# Altium PCB Alarm-Clock-v1.1.PcbDoc (part 1 of 4)
Units mm, origin at the board's own origin, x right, y up, seen from the top; angles counter-clockwise.
Board outline 56 x 73 mm, 2 copper layers (Top Layer, Bottom Layer), stack 1.448 mm thick; 146 components, 110 nets, 466 pads, 352 vias.
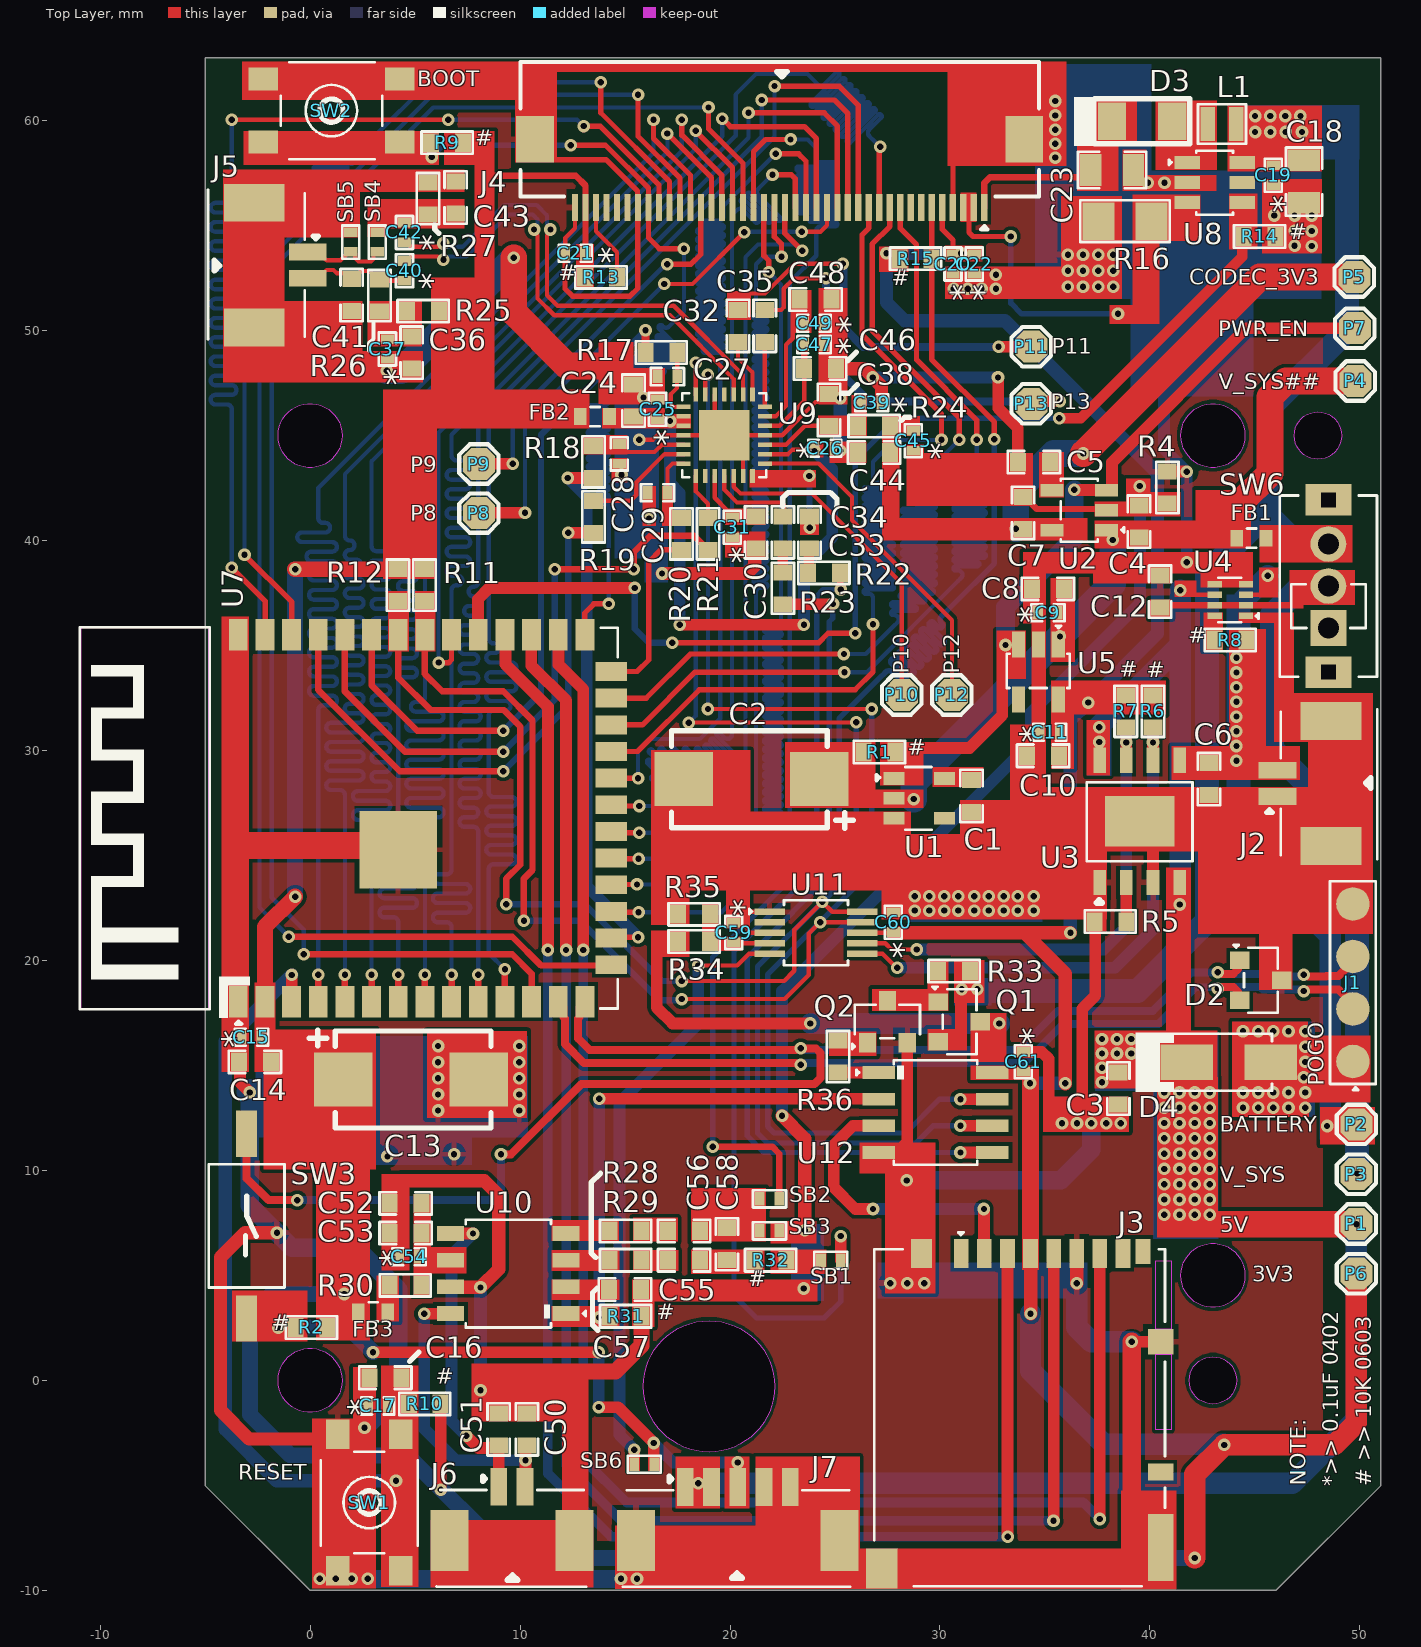
[diagram p0: Top Layer view]
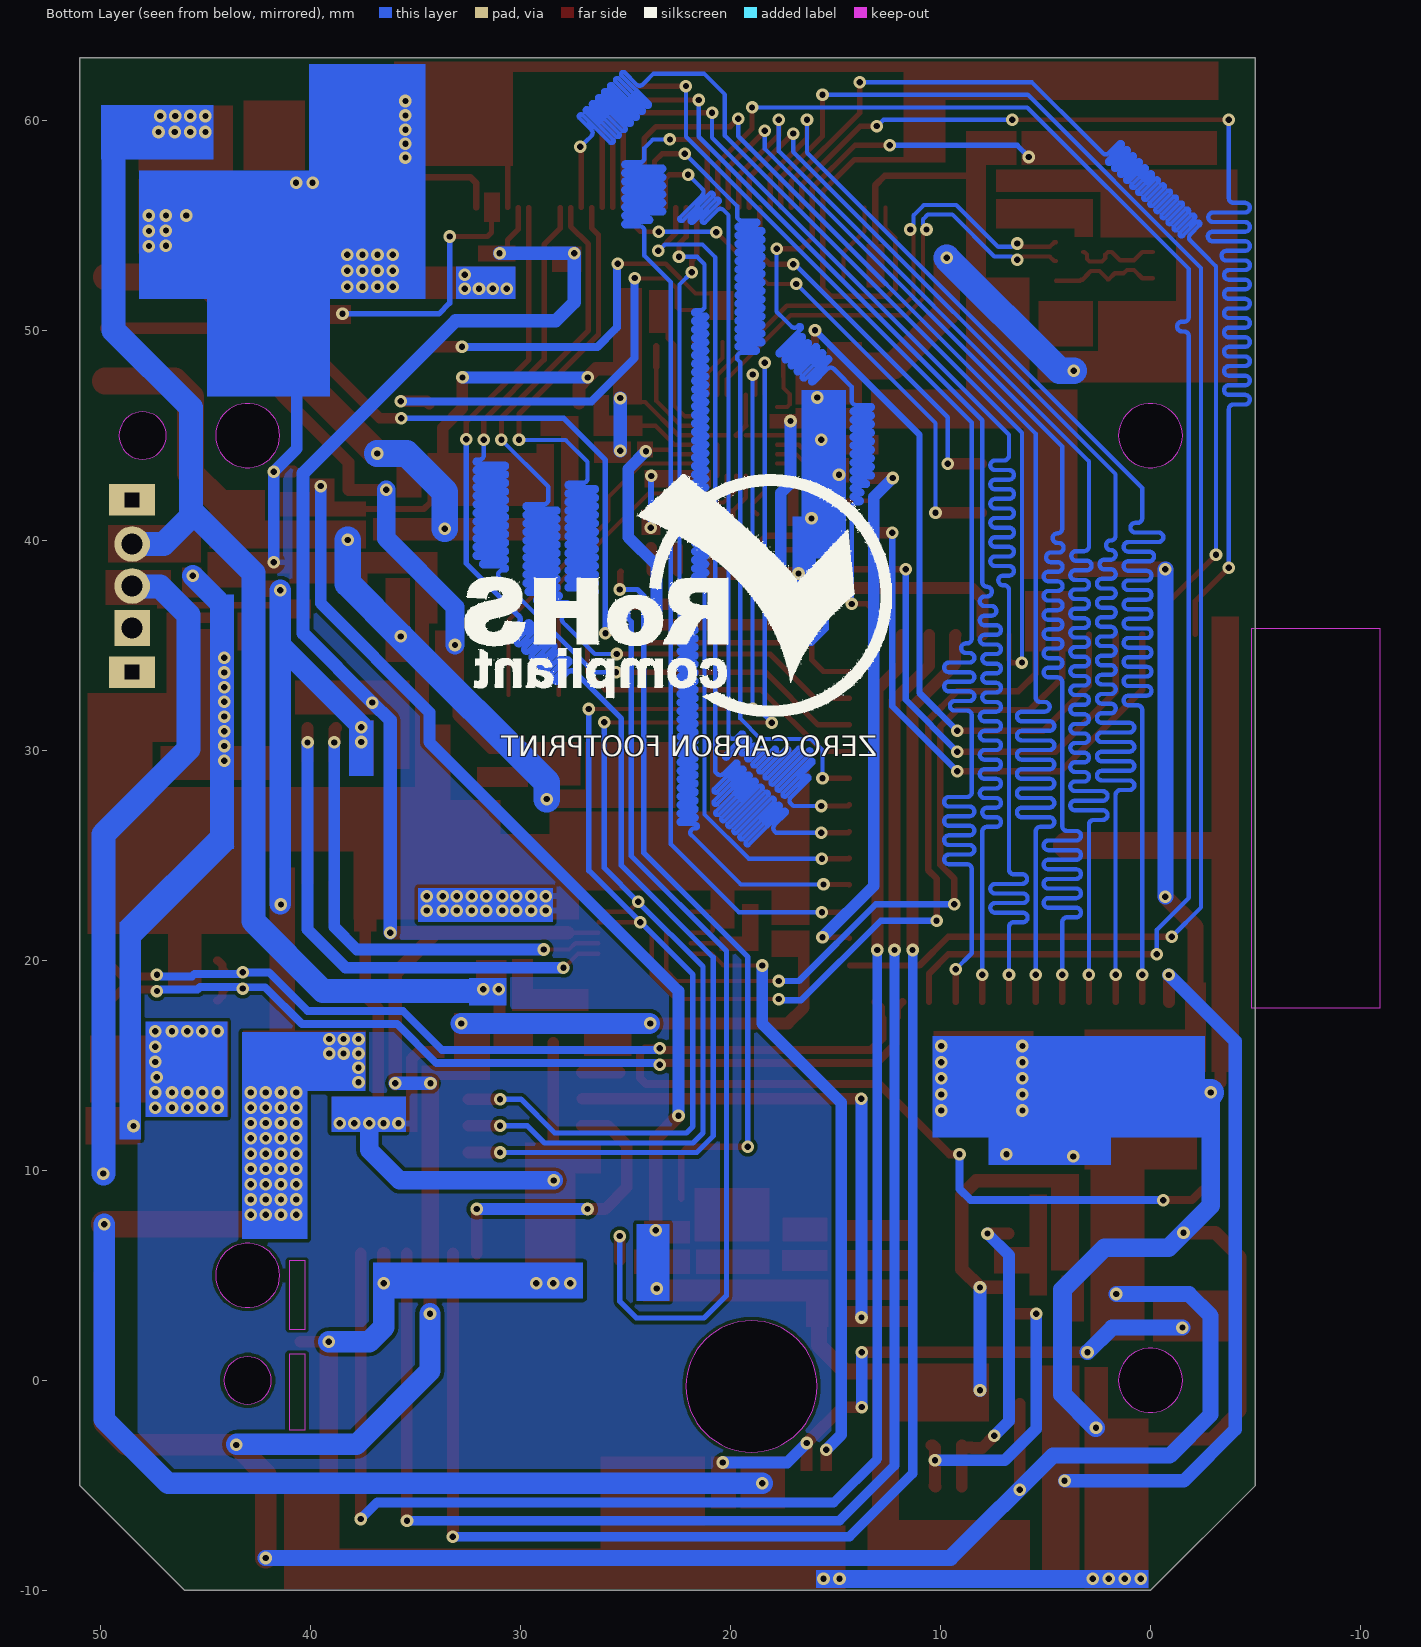
[diagram p1: Bottom Layer view, seen from below]
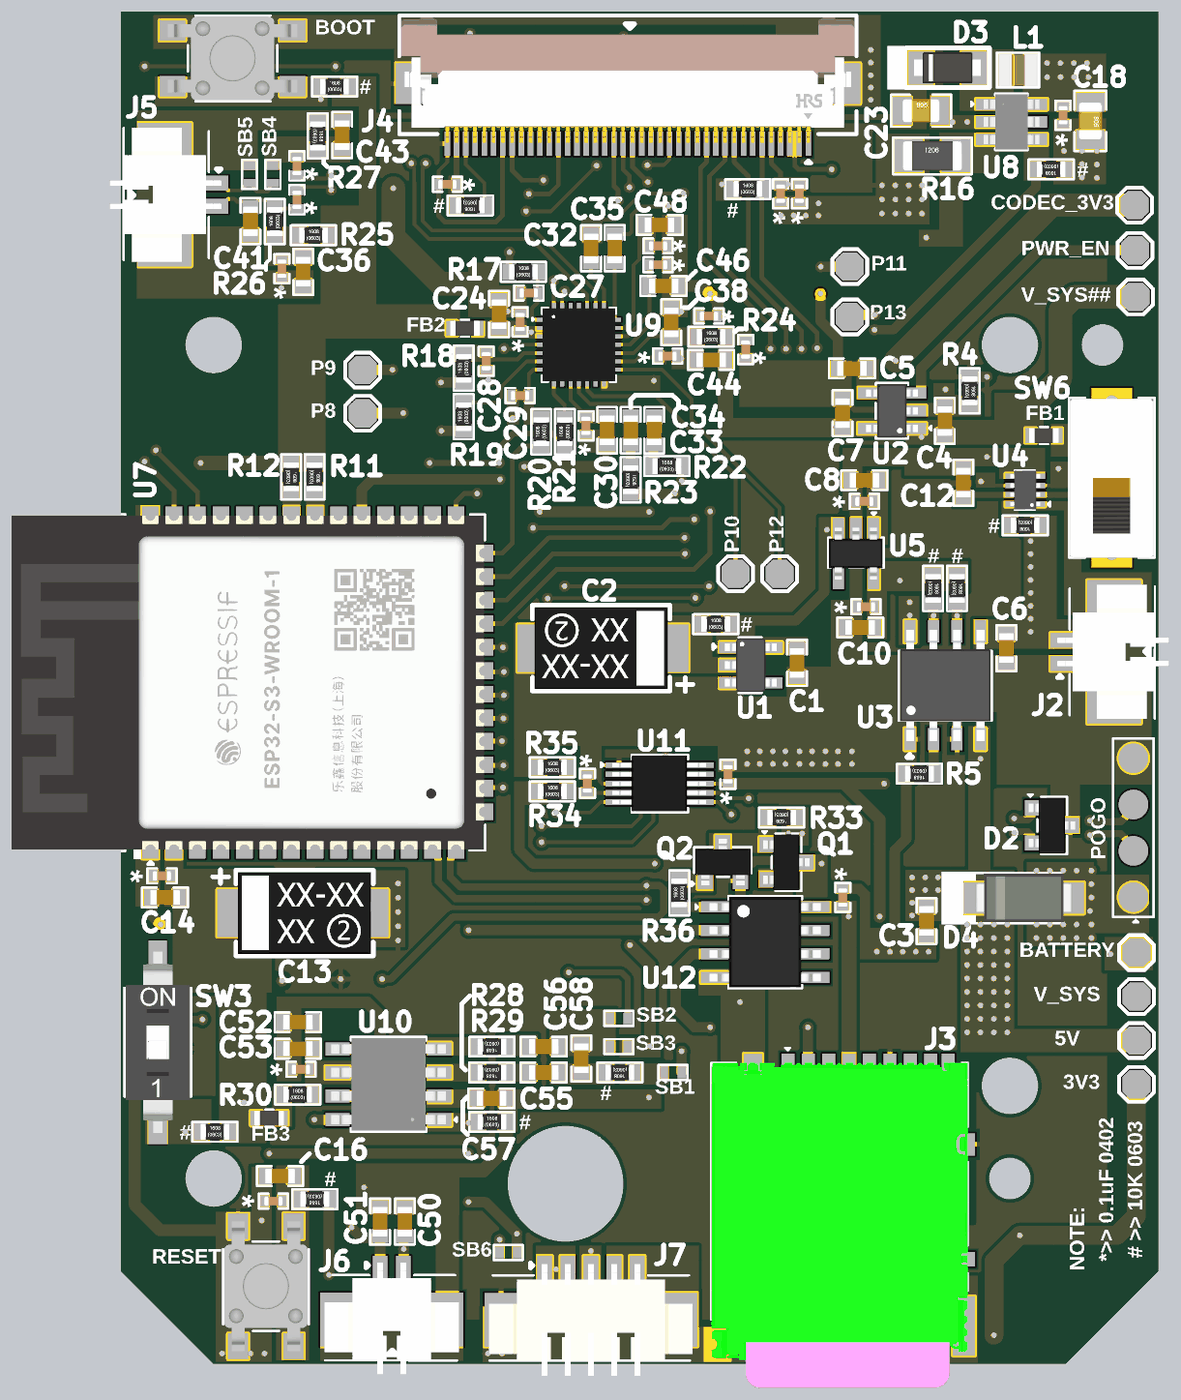
[diagram p4: 3D render of the assembled board from above, using the file's embedded part models]

## Layer stack, top to bottom
Top Solder: solder mask 0.0762, Solder Resist, Dk 3.5
Top Layer: signal copper 0.254
Dielectric 1: dielectric 0.9398, FR-4, Dk 4.8
Bottom Layer: signal copper 0.254
Bottom Solder: solder mask 0.0762, Solder Resist, Dk 3.5

## Board outline
-5,-5 0,-10 46,-10 51,-5 51,63 -5,63
cut-out: -1.527,0 cw(c0,0) 1.527,0 cw(c0,0)
cut-out: 15.873,-0.285 cw(c19,-0.285) 22.127,-0.285 cw(c19,-0.285)
cut-out: 41.873,0 cw(c43,0) 44.127,0 cw(c43,0)
cut-out: 41.473,5 cw(c43,5) 44.527,5 cw(c43,5)
cut-out: 46.873,45 cw(c48,45) 49.127,45 cw(c48,45)
cut-out: -1.527,45 cw(c0,45) 1.527,45 cw(c0,45)
cut-out: 41.473,45 cw(c43,45) 44.527,45 cw(c43,45)

## Design rules (kind name [scope] priority, off if disabled: settings)
Clearance [All] p1: gap=0.178 ignorepadtopadclearanceinfootprint=FALSE except(0: Arc-Hole Track-Hole SMDPad-Hole THPad-Hole Via-Hole Fill-Hole Poly-Hole Region-Hole Text-Hole; 0.102: Arc-SMDPad Track-SMDPad SMDPad-SMDPad)
ComponentClearance [All] p1: gap=0 collisioncheckmode=3 verticalgap=0 showdistances=FALSE
DiffPairsRouting [All] p1: maxlimit=0.254 minlimit=0.254 mostfreqgap=0.254 toplayer_minwidth=0.203 toplayer_maxwidth=0.381 toplayer_prefwidth=0.381 bottomlayer_minwidth=0.203 bottomlayer_maxwidth=0.381 bottomlayer_prefwidth=0.381 maxuncoupledlength=12.7
HoleToHoleClearance [All] p1: gap=0 allowstackedmicrovias=TRUE
MatchedLengths MatchedLengths_1 [InNetClass('MIC1')] p1: tolerance=25.4 checknetsindiffpair=FALSE checkdiffpairvsdiffpair=TRUE checkxsignals=TRUE checkothers=TRUE
MatchedLengths [InNetClass('MIC1_IN')] p2: tolerance=0.508 checknetsindiffpair=FALSE checkdiffpairvsdiffpair=TRUE checkxsignals=TRUE checkothers=TRUE
MatchedLengths "Schematic Matched Net Lengths" [InNetClass('USB')] p3: tolerance=1.27 checknetsindiffpair=FALSE checkdiffpairvsdiffpair=TRUE checkxsignals=TRUE checkothers=TRUE
MaxMinImpedance "Schematic Impedance Constraint" [InNetClass('USB')] p1: minimum=85.00 maximum=90.00
MinimumSolderMaskSliver [All] p1: minsoldermaskwidth=0
PolygonConnect [All] p1: connectstyle=Relief reliefconductorwidth=0.254 reliefentries=4 polygonreliefangle="90 Angle" airgapwidth=0.254
RoutingVias [All] p1: holewidth=0.3 width=0.6 viastyle="Through Hole" minholewidth=0.3 minwidth=0.6 maxholewidth=0.3 maxwidth=0.6
SilkToSilkClearance [All] p1: silktosilkclearance=0
SilkToSolderMaskClearance [IsPad] p1: minsilkscreentomaskgap=0 clearancetoexposedcopper=TRUE
SolderMaskExpansion [All] p1: expansion=0.102 istentingtop=FALSE
Width [All] p1: maxlimit=1.27 minlimit=0.203 preferedwidth=0.559 minimp=50.000000 maximp=50.000000 favimp=50.000000
24 further rules are at their usual default settings.

## Classes and differential pairs
differential pair class MIC1_IN_Lines: MIC_IN
net class MIC1_IN: MIC_IN_N MIC_IN_P
differential pair class USB_Lines: USB_D
differential pair class MIC1_Lines: MIC
net class USB: USB_D_N USB_D_P
net class MIC1: MIC_N MIC_P
component class U_Power-Sheet: C1 C2 C3 C4 C5 C6 C7 C8 C9 C10 C11 C12 D2 D4 FB1 J1 J2 P1 P2 P3 P4 P5 P6 P7 R1 R4 R5 R6 R7 R8 SW6 U1 U2 U3 U4 U5
component class U_LCD-Sheet: C18 C19 C20 C21 C22 C23 D3 J4 L1 P8 P9 R13 R14 R15 R16 U8
component class U_Controller-Sheet: C13 C14 C15 C16 C17 J3 R2 R9 R10 R11 R12 SW1 SW2 SW3 U7
component class U_Audio-Sheet: C24 C25 C26 C27 C28 C29 C30 C31 C32 C33 C34 C35 C36 C37 C38 C39 C40 C41 C42 C43 C44 C45 C46 C47 C48 C49 C50 C51 C52 C53 C54 C55 C56 C57 C58 FB2 FB3 J5 J6 P10 P11 P12 P13 R17 R18 R19 R20 R21 R22 R23 R24 R25 R26 R27 R28 R29 R30 R31 R32 SB1 SB2 SB3 SB4 SB5 U9 U10
component class U_ADC-GPIO-Expand-Sheet: C59 C60 C61 J7 Q1 Q2 R33 R34 R35 R36 SB6 U11 U12
differential pair MIC: +MIC_P -MIC_N
differential pair USB_D: +USB_D_P -USB_D_N
differential pair MIC_IN: +MIC_IN_P -MIC_IN_N

## Components (designator, comment, footprint, x,y, rotation, side; value= is the part's Value field where it differs from the comment)
C1 "10nF" CAP-0603 31.504,27.836 r90 top locked
C2 "100uF" CASE-E 24.245,28.634 r180 top locked
C3 "1uF" CAP-0603 38.494,13.902 r270 top locked
C4 "1uF" CAP-0603 39.485,40.902 r90 top locked
C5 "22nF" CAP-0603 34.472,43.735 r0 top locked
C6 "1uF" CAP-0603 42.812,28.634 r270 top locked
C7 "1uF" CAP-0603 33.964,41.322 r90 top locked
C8 "1uF" CAP-0603 35.141,37.701 r180 top locked
C9 "100nF" CAP-0402 35.141,36.558 r180 top locked
C10 "1uF" CAP-0603 34.913,29.751 r180 top locked
C11 "100nF" CAP-0402 35.23,30.869 r180 top locked
C12 "1uF" CAP-0603 40.488,37.567 r90 top locked
C13 "100uF" CASE-E 1.588,14.333 r0 top locked
C14 "10uF" CAP-0603 -2.629,15.172 r180 top locked
C15 "100nF" CAP-0402 -2.794,16.34 r180 top locked
C16 "1uF" CAP-0603 3.581,0.127 r0 top
C17 "100nF" CAP-0402 3.226,-1.219 r0 top
C18 "22uF" CAP-0805 47.346,57.099 r270 top
C19 "100nF" CAP-0402 45.872,57.404 r270 top
C20 "100nF" CAP-0402 30.62,53.17 r270 top locked
C21 "100nF" CAP-0402 12.624,53.678 r180 top locked
C22 "100nF" CAP-0402 31.636,53.17 r270 top locked
C23 "22uF" CAP-0805 38.204,57.65 r0 top locked
C24 "4.7uF" CAP-0603 15.405,46.668 r270 top locked
C25 "100nF" CAP-0402 16.548,46.249 r270 top locked
C26 "100nF" CAP-0402 24.511,44.399 r180 top
C27 "33pF" CAP-0402 17.018,47.811 r180 top locked
C28 "33pF" CAP-0402 14.72,44.128 r270 top locked
C29 "33pF" CAP-0402 16.548,42.273 r180 top locked
C30 "4.7uF" CAP-0603 21.247,40.394 r90 top
C31 "100nF" CAP-0402 20.104,40.635 r90 top
C32 "1uF" CAP-0603 20.384,50.224 r90 top locked
C33 "1uF" CAP-0603 23.787,40.394 r270 top
C34 "1uF" CAP-0603 22.517,40.394 r270 top
C35 "1uF" CAP-0603 21.654,50.224 r90 top locked
C36 "10uF" CAP-0603 4.839,48.954 r90 top
C37 "100nF" CAP-0402 3.683,49.124 r90 top
C38 "4.7uF" CAP-0603 24.714,46.228 r90 top
C39 "100nF" CAP-0402 26.746,46.566 r0 top locked
C40 "100nF" CAP-0402 4.496,52.845 r270 top
C41 "10nF" CAP-0603 1.981,51.689 r90 top
C42 "100nF" CAP-0402 4.496,54.673 r90 top
C43 "10nF" CAP-0603 6.934,56.337 r270 top
C44 "4.7uF" CAP-0603 26.861,44.196 r180 top
C45 "100nF" CAP-0402 28.727,44.755 r270 top
C46 "4.7uF" CAP-0603 24.295,48.192 r0 top
C47 "100nF" CAP-0402 24.003,49.335 r0 top
C48 "4.7uF" CAP-0603 24.079,51.486 r0 top
C49 "100nF" CAP-0402 24.003,50.351 r0 top
C50 "330pF" CAP-0603 10.325,-2.329 r90 top locked
C51 "330pF" CAP-0603 8.979,-2.329 r90 top locked
C52 "10uF" CAP-0603 4.547,8.433 r180 top
C53 "1uF" CAP-0603 4.547,7.01 r180 top
C54 "100nF" CAP-0402 4.712,5.893 r180 top
C55 "15nF" CAP-0603 17.818,5.723 r180 top locked
C56 "15nF" CAP-0603 17.818,7.12 r180 top locked
C57 "1uF" CAP-0603 14.999,4.326 r0 top locked
C58 "8.2nF" CAP-0603 19.85,6.485 r270 top locked
C59 "100nF" CAP-0402 20.181,21.331 r270 top locked
C60 "100nF" CAP-0402 27.775,21.826 r90 top locked
C61 "100nF" CAP-0402 33.973,15.172 r90 top locked
D2 "ESD5302F-3/TR" SOT-23 45.272,19.06 r270 top locked
D3 "DSK24 K24" SOD-123FL 39.632,59.969 r0 top locked
D4 "SS32 /SMA(DO-214AC)" SMA 43.752,15.146 r0 top locked
FB1 "BLM18SG121TN1D" "IND-0603 (1608 METRIC)" 44.83,40.114 r0 top locked
FB2 "BLM18SG121TN1D" "IND-0603 (1608 METRIC)" 13.562,45.906 r0 top locked
FB3 "BLM18PG181SN1D" "IND-0603 (1608 METRIC)" 2.996,3.259 r0 top locked
J1 "POGO Connector 4 Pin" "POGO 4 PIN" 49.67,18.94 r90 top locked
J2 "1.25-2PWB" 1.25-2PWB 47.351,28.433 r90 top locked
J3 "DM3BT-DSF-PEJS" DM3BT-DSF-PEJS 33.866,-1.408 r0 top locked
J4 "FH12A-40S-0.5SH(55)" FH12A-40S-0.5SH(55) 22.365,57.488 r0 top locked
J5 "1.25-2PWB" 1.25-2PWB -1.384,53.119 r270 top locked
J6 "1.25-2PWB" 1.25-2PWB 9.614,-6.342 r0 top locked
J7 "1.25-5PWB" 1.25-5PWB 20.371,-6.35 r0 top locked
L1 "2.2uH" IHHP0806AZER2R2M01 43.435,59.842 r180 top locked
P1 "TEST POINT" TEST-POINT 49.835,7.451 r0 top
P2 "TEST POINT" TEST-POINT 49.835,12.192 r0 top
P3 "TEST POINT" TEST-POINT 49.835,9.821 r0 top
P4 "TEST POINT" TEST-POINT 49.784,47.6 r0 top
P5 "TEST POINT" TEST-POINT 49.733,52.553 r0 top
P6 "TEST POINT" TEST-POINT 49.835,5.08 r0 top
P7 "TEST POINT" TEST-POINT 49.759,50.114 r0 top
P8 "TEST POINT" TEST-POINT 8.039,41.308 r270 top locked
P9 "TEST POINT" TEST-POINT 8.039,43.645 r270 top locked
P10 "TEST POINT" TEST-POINT 28.182,32.647 r90 top locked
P11 "TEST POINT" TEST-POINT 34.354,49.233 r180 top
P12 "TEST POINT" TEST-POINT 30.569,32.647 r90 top locked
P13 "TEST POINT" TEST-POINT 34.354,46.515 r180 top
Q1 "AO3407" SOT-23 30.925,17.077 r270 top locked
Q2 "MMBT2222A-7-F" SOT-23 27.496,17.077 r0 top locked
R1 "10K" RES-0603 27.115,29.929 r180 top locked
R2 "10K" RES-0603 0.064,2.522 r180 top locked
R4 "0R" RES-0603 40.831,42.527 r90 top locked
R5 "1.5K" RES-0603 38.113,21.852 r0 top
R6 "10K" RES-0603 40.145,31.859 r90 top locked
R7 "10K" RES-0603 38.85,31.859 r90 top locked
R8 "10K" RES-0603 43.828,35.263 r0 top locked
R9 "10K" RES-0603 6.528,58.953 r180 top
R10 "10K" RES-0603 5.461,-1.118 r0 top
R11 "4.7K" RES-0603 5.449,37.879 r90 top locked
R12 "4.7K" RES-0603 4.179,37.879 r90 top locked
R13 "10K" RES-0603 13.856,52.535 r0 top locked
R14 "10K" RES-0603 45.227,54.483 r0 top locked
R15 "10K" RES-0603 28.842,53.424 r180 top locked
R16 "5.6R" RES-1206 38.813,55.212 r0 top locked
R17 "22R" RES-0603 16.726,48.954 r180 top locked
R18 "22R" RES-0603 13.5,43.747 r270 top locked
R19 "22R" RES-0603 13.5,41.13 r270 top locked
R20 "22R" RES-0603 17.691,40.318 r270 top locked
R21 "22R" RES-0603 18.961,40.318 r270 top locked
R22 "0R" RES-0603 24.473,38.463 r180 top
R23 "0R" RES-0603 22.517,37.727 r90 top
R24 "10R" RES-0603 26.861,45.448 r180 top
R25 "1K" RES-0603 5.385,50.927 r180 top
R26 "2.2K" RES-0603 3.302,51.664 r270 top
R27 "2.2K" RES-0603 5.613,56.286 r90 top
R28 "22.1K" RES-0603 15.024,5.723 r0 top locked
R29 "22.1K" RES-0603 15.024,7.12 r0 top locked
R30 "10R" RES-0603 4.534,4.529 r180 top locked
R31 "10K" RES-0603 15.024,3.056 r180 top locked
R32 "10K" RES-0603 21.933,5.723 r0 top locked
R33 "1K" RES-0603 30.671,19.49 r0 top locked
R34 "100K" RES-0603 18.288,20.904 r180 top locked
R35 "270K" RES-0603 18.288,22.2 r180 top locked value=270kR
R36 "1K" RES-0603 25.146,15.418 r270 top
SB1 "Solder Bridge 0402" "Solder Bridge 0402" 24.803,5.723 r180 top locked
SB2 "Solder Bridge 0402" "Solder Bridge 0402" 21.882,8.644 r180 top locked
SB3 "Solder Bridge 0402" "Solder Bridge 0402" 21.882,7.12 r180 top locked
SB4 "Solder Bridge 0402" "SOLDER BRIDGE 0402" 3.2,54.216 r270 top
SB5 "Solder Bridge 0402" "SOLDER BRIDGE 0402" 1.93,54.216 r270 top
SB6 "Solder Bridge 0402" "SOLDER BRIDGE 0402" 15.913,-4 r0 top locked
SW1 "TS-1109S-C-B" TS-1109S-C-B 2.819,-5.817 r270 top
SW2 "TS-1109S-C-B" TS-1109S-C-B 1.016,60.477 r0 top
SW3 "DSIC01LSGET" DSIC01LSGET -3.023,7.346 r270 top locked
SW6 "SS-12D02-G040" SS-12D02-G040 48.502,37.835 r90 top locked
U1 "BU4231G-TR" SSOP-5-1.6MM 29.009,27.719 r0 top locked
U2 "RT9193-33GB" SOT-23-5 36.631,41.449 r180 top locked
U3 "TP4056-42-ESOP8" ESOP-8 39.51,26.627 r90 top locked
U4 "LM66200DRLR" SOT-583 43.828,37.168 r180 top locked
U5 "RT9080-33GJ5" TSOT-23-5 34.684,33.739 r270 top locked
U7 "ESP32-S3-WROOM-1-N16R8" "41-SMD MODULE" 5.459,26.774 r90 top locked
U8 "LP3320B6F" SOT-23-6 43.094,57.048 r0 top locked
U9 "ES8388" QFN-28-EP(4X4) 19.723,45.017 r0 top locked
U10 "MIX2052" SOP-8 9.436,5.088 r180 top locked
U11 "ADS1015IDGSR" VSSOP-10 24.092,21.318 r0 top locked
U12 "PCA9536D" SOIC-8 29.782,12.759 r0 top locked

## Footprints (in the part's own frame and the unit in brackets; to place one, negate y for a bottom-side part, rotate by r counter-clockwise, add the part's x,y. Pads: shape width x height; smd on the part's side, far side on the other; paste and mask are expansions set on the pad)
1.25-2PWB [mm]
  rect 0.8x1.8 smd: 1(-0.625,1.275) 2(0.625,1.275)
  rect 1.8x2.9 smd: MP1(-2.975,-1.275) MP2(2.975,-1.275)
  silkscreen extent -3.6,-3.48 3.52,1.78, body extent -3.62,-4.24 3.62,1.81, height 3.5
1.25-5PWB [mm]
  rect 0.8x1.8 smd: 1(-2.5,1.275) 2(-1.25,1.275) 3(0,1.275) 4(1.25,1.275) 5(2.5,1.275)
  rect 1.8x2.9 smd: MP1(-4.85,-1.275) MP2(4.85,-1.275)
  silkscreen extent -5.47,-3.47 5.35,1.78, body extent -5.5,-4.32 5.5,1.73, height 3.56
"41-SMD MODULE" [mm]
  rect 1.5x0.9 smd: 1(-8.75,8.88) 2(-8.75,7.61) 3(-8.75,6.34) 4(-8.75,5.07) 5(-8.75,3.8) 6(-8.75,2.53) 7(-8.75,1.26) 8(-8.75,-0.01) 9(-8.75,-1.28) 10(-8.75,-2.55) 11(-8.75,-3.82) 12(-8.75,-5.09) 13(-8.75,-6.36) 14(-8.75,-7.63) 27(8.75,-7.63) 28(8.75,-6.36) 29(8.75,-5.09) 30(8.75,-3.82) 31(8.75,-2.55) 32(8.75,-1.28) 33(8.75,-0.01) 34(8.75,1.26) 35(8.75,2.53) 36(8.75,3.8) 37(8.75,5.07) 38(8.75,6.34) 39(8.75,7.61) 40(8.75,8.88)
  rect 0.9x1.5 smd: 15(-6.98,-8.88) 16(-5.71,-8.88) 17(-4.44,-8.88) 18(-3.17,-8.88) 19(-1.9,-8.88) 20(-0.63,-8.88) 21(0.64,-8.88) 22(1.91,-8.88) 23(3.18,-8.88) 24(4.45,-8.88) 25(5.72,-8.88) 26(6.99,-8.88)
  rect 3.7x3.7 smd: 41(-1.5,1.26)
  Keep-Out Layer region: -9.042,10.287 9.042,10.287 9.042,16.383 -9.042,16.383
  silkscreen extent -9.8,-9.2 9.09,16.43, body extent -9.01,-9.14 9.01,16.37, height 3.16
CAP-0402 [mil]
  rect 18x25 smd mask+2.36: 1(-18.5,0) 2(18.5,0)
  silkscreen extent -31,-16 31,16, body extent -20,-10 20,10, height 19
CAP-0603 [mil]
  rect 30x35 smd mask+2.36: 1(-30,0) 2(30,0)
  silkscreen extent -49,-21 49,21, body extent -32,-16 31,16, height 34
CAP-0805 [mil] "SMD 0805"
  rect 40x60 smd mask+2.76: 1(-40,0) 2(40,0)
  silkscreen extent -64,-34 64,34, body extent -39,-25 39,25, height 30
CASE-E [mm]
  rect 2.79x2.57 smd: 1(0,0) 2(6.44,0)
  silkscreen extent -1.63,-2.31 7.03,2.34, body extent -0.27,-2.21 6.92,2.21, height 2.88
DM3BT-DSF-PEJS [mm]
  rect 0.7x1.4 smd: 1(-2.85,7.45) 2(-1.75,7.45) 3(-0.65,7.45) 4(0.45,7.45) 5(1.55,7.45) 6(2.65,7.45) 7(3.75,7.45) 8(4.85,7.45)
  rect 1x1.4 smd: S1(-4.75,7.45)
  rect 1.2x1.2 smd: S2(6.65,3.25)
  rect 1.2x3.2 smd: S3(6.65,-6.55)
  rect 1.5x1.9 smd paste-2 mask+0: S4(-6.65,-7.55)
  rect 1.2x0.8 smd: SW-A(6.65,-2.95)
  rect 0.7x1.2 smd: SW-B(5.8,7.55)
  Top Layer region: -5.9,-7.85 -5.75,-8 -5.4,-8 -5.4,-8.5 -7.4,-8.5 -7.4,-6.6 -5.9,-6.6
  Keep-Out Layer region: 7.15,3.85 6.4,3.85 6.4,7.1 7.15,7.1
  Keep-Out Layer region: 7.15,-0.95 6.4,-0.95 6.4,2.65 7.15,2.65
  silkscreen extent -7,-8.4 6.85,8.46, body extent -6.98,-9.89 6.87,7.66, height 1.85
DSIC01LSGET [mm]
  rect 2.2x1 smd mask+0.055: 1(-4.4,0) 2(4.4,0)
  silkscreen extent -2.95,-1.8 2.92,1.8, body extent -4.9,-1.74 4.9,1.74, height 4.36
ESOP-8 [mm]
  rect 1.2x0.6 smd: 1(-2.909,1.905) 2(-2.909,0.635) 3(-2.909,-0.635) 4(-2.909,-1.905) 5(2.909,-1.905) 6(2.909,-0.635) 7(2.909,0.635) 8(2.909,1.905)
  rect 2.4x3.3 smd: 9(0,0)
  silkscreen extent -3.88,-2.51 1.85,2.51, body extent -3,-2.45 3,2.45, height 1.75
FH12A-40S-0.5SH(55) [mm]
  rect 0.3x1.3 smd: 1(9.75,-1.625) 2(9.25,-1.625) 3(8.75,-1.625) 4(8.25,-1.625) 5(7.75,-1.625) 6(7.25,-1.625) 7(6.75,-1.625) 8(6.25,-1.625) 9(5.75,-1.625) 10(5.25,-1.625) 11(4.75,-1.625) 12(4.25,-1.625) 13(3.75,-1.625) 14(3.25,-1.625) 15(2.75,-1.625) 16(2.25,-1.625) 17(1.75,-1.625) 18(1.25,-1.625) 19(0.75,-1.625) 20(0.25,-1.625) 21(-0.25,-1.625) 22(-0.75,-1.625) 23(-1.25,-1.625) 24(-1.75,-1.625) 25(-2.25,-1.625) 26(-2.75,-1.625) 27(-3.25,-1.625) 28(-3.75,-1.625) 29(-4.25,-1.625) 30(-4.75,-1.625) 31(-5.25,-1.625) 32(-5.75,-1.625) 33(-6.25,-1.625) 34(-6.75,-1.625) 35(-7.25,-1.625) 36(-7.75,-1.625) 37(-8.25,-1.625) 38(-8.75,-1.625) 39(-9.25,-1.625) 40(-9.75,-1.625)
  rect 1.8x2.2 smd: MP1(-11.65,1.625) MP2(11.65,1.625)
  silkscreen extent -12.35,-2.67 12.35,5.3, body extent -12.25,-1.57 12.25,5.21, height 3.5
IHHP0806AZER2R2M01 [mm]
  rect 0.7x1.62 smd: 1(-0.675,0) 2(0.675,0)
  silkscreen extent -1.14,-0.94 1.14,0.94, body extent -1.07,-0.85 1.04,0.85, height 0.99
"IND-0603 (1608 METRIC)" [mm] "0.063\" L x 0.032\" W (1.60mm x 0.80mm)"
  rect 0.6x0.8 smd: 1(-0.7,0) 2(0.7,0)
  silkscreen extent -0.2,-0.46 0.23,0.46, body extent -0.8,-0.4 0.8,0.4, height 0.78
"POGO 4 PIN" [mm]
  round 1.6 smd: 1(-3.75,0) 2(-1.25,0) 3(1.25,0) 4(3.75,0)
  silkscreen extent -5.11,-1.09 4.83,1.09
QFN-28-EP(4X4) [mm]
  rect 0.665x0.22 smd: 1(-1.933,1.35) 2(-1.933,0.9) 3(-1.933,0.45) 4(-1.933,0) 5(-1.933,-0.45) 6(-1.933,-0.9) 7(-1.933,-1.35) 15(1.933,-1.35) 16(1.933,-0.9) 17(1.933,-0.45) 18(1.933,0) 19(1.933,0.45) 20(1.933,0.9) 21(1.933,1.35)
  rect 0.22x0.665 smd: 8(-1.35,-1.933) 9(-0.9,-1.933) 10(-0.45,-1.933) 11(0,-1.933) 12(0.45,-1.933) 13(0.9,-1.933) 14(1.35,-1.933) 22(1.35,1.933) 23(0.9,1.933) 24(0.45,1.933) 25(0,1.933) 26(-0.45,1.933) 27(-0.9,1.933) 28(-1.35,1.933)
  rect 2.4x2.4 smd: 29(0,0)
  silkscreen extent -2.51,-2 2,2, body extent -1.96,-1.96 1.96,1.96, height 0.7
RES-0603 [mil]
  rect 30x35 smd: 1(-30,0) 2(30,0)
  silkscreen extent -48,-21 48,21, body extent -31,-17 31,17, height 18
RES-1206 [mil]
  rect 60x70 smd: 1(-50,0) 2(50,0)
  silkscreen extent -84,-39 84,39, body extent -63,-31 63,32, height 39
SMA [mm]
  rect 2.5x1.7 smd: 1(-2,0) 2(2,0)
  silkscreen extent -4.44,-1.42 2.06,1.42, body extent -2.6,-1.3 2.6,1.3, height 2.4
SOD-123FL [mm]
  rect 1.34x1.8 smd: 1(-1.43,0) 2(1.43,0)
  silkscreen extent -3.25,-1.17 2.26,1.17, body extent -1.8,-0.82 1.8,0.82, height 0.95
SOIC-8 [mm]
  rect 1.55x0.6 smd: 1(-2.7,1.905) 2(-2.7,0.635) 3(-2.7,-0.635) 4(-2.7,-1.905) 5(2.7,-1.905) 6(2.7,-0.635) 7(2.7,0.635) 8(2.7,1.905)
  silkscreen extent -3.76,-2.49 1.99,2.49, body extent -3,-2.45 3,2.45, height 1.7
"Solder Bridge 0402" [mil]
  rect 18x25 smd mask+2.17: 1(-18.5,0) 2(18.5,0)
  silkscreen extent -32,-17 32,16
"SOLDER BRIDGE 0402" [mil]
  rect 18x25 smd mask+2.17: 1(-18.5,0) 2(18.5,0)
  silkscreen extent -32,-17 32,16
SOP-8 [mm]
  rect 1.3x0.7 smd: 1(-2.75,1.905) 2(-2.75,0.635) 3(-2.75,-0.635) 4(-2.75,-1.905) 5(2.75,-1.905) 6(2.75,-0.635) 7(2.75,0.635) 8(2.75,1.905)
  silkscreen extent -3.69,-2.57 2.03,2.57, body extent -3.1,-2.5 3.1,2.5, height 1.76
SOT-23 [mm] "TRANS NPN 40V 0.6A SOT23"
  rect 0.82x0.92 smd: 1(-0.95,-1) 2(0.95,-1) 3(0,1)
  silkscreen extent -1.68,-1.3 1.55,0.81, body extent -1.5,-1.25 1.5,1.25, height 1.05
SOT-23-5 [mm]
  rect 1.1x0.6 smd: 1(-1.3,0.95) 2(-1.3,0) 3(-1.3,-0.95) 4(1.3,-0.95) 5(1.3,0.95)
  silkscreen extent -2.13,-1.5 0.88,1.5, body extent -1.4,-1.45 1.4,1.45, height 1.45
SOT-23-6 [mm]
  rect 1.22x0.62 smd: 1(-1.31,0.95) 2(-1.31,0) 3(-1.31,-0.95) 4(1.31,-0.95) 5(1.31,0) 6(1.31,0.95)
  silkscreen extent -2.18,-1.52 0.86,1.52, body extent -1.5,-1.5 1.5,1.5, height 1.47
SOT-583 [mm]
  rect 0.67x0.3 smd: 1(-0.74,0.75) 2(-0.74,0.25) 3(-0.74,-0.25) 4(-0.74,-0.75) 5(0.74,-0.75) 6(0.74,-0.25) 7(0.74,0.25) 8(0.74,0.75)
  silkscreen extent -1.35,-1.07 0.56,1.07, body extent -0.8,-1.05 0.8,1.05, height 0.6
SS-12D02-G040 [mm]
  rect 1.7x1.7 hole 1: 1(-2,0)
  round 1.7 hole 1: 2(0,0) 3(2,0)
  rect 1.5x2.2 hole 0.7 square: MH1(-4.1,0) MH2(4.1,0)
  silkscreen extent -4.32,-2.31 4.32,2.31, body extent -4.32,-2.25 4.28,2.25, height 9.47
SSOP-5-1.6MM [mm]
  rect 1x0.6 smd: 1(-1.2,0.95) 2(-1.2,0) 3(-1.2,-0.95) 4(1.2,-0.95) 5(1.2,0.95)
  silkscreen extent -2.03,-1.5 0.58,1.5, body extent -1.4,-1.45 1.4,1.45, height 1.25
TEST-POINT [mil]
  oct 60x60 smd: 1(0,0)
  silkscreen extent -37,-37 37,37
TS-1109S-C-B [mm]
  rect 1.4x1.1 smd: 1(-3.25,-1.5) 2(3.25,-1.5) 3(3.25,1.5) 4(-3.25,1.5)
  silkscreen extent -2.41,-2.31 2.41,2.31, body extent -3.5,-2.25 3.5,2.25, height 4.3
TSOT-23-5 [mm]
  rect 1.22x0.62 smd: 1(-1.31,0.95) 2(-1.31,0) 3(-1.31,-0.95) 4(1.31,-0.95) 5(1.31,0.95)
  silkscreen extent -2.21,-1.5 0.76,1.5, body extent -1.4,-1.45 1.4,1.45, height 0.95
VSSOP-10 [mm]
  rect 1.45x0.3 smd: 1(-2.2,1) 2(-2.2,0.5) 3(-2.2,0) 4(-2.2,-0.5) 5(-2.2,-1) 6(2.2,-1) 7(2.2,-0.5) 8(2.2,0) 9(2.2,0.5) 10(2.2,1)
  silkscreen extent -3.17,-1.55 1.52,1.55, body extent -2.56,-1.5 2.51,1.5, height 1.09

## Part data
C1 C41 C43: library part CC0603JRNPO9BN103, "CAP CER 10000PF 50V C0G/NPO 0603", Case/Package=0603, LCSC Part Number=C389113, Manufacturer=Yageo, Max Operating Temperature=125°C, Min Operating Temperature=-55°C, Tolerance=5%, Voltage Rating=50V, Capacitance=10nF, Category="Ceramic Capacitors", ComponentLink1Description=http://www.yageo.com/documents/recent/UPY-GP_NP0_16V-to-50V_16.pdf?src-supplier=Digi-Key, ComponentLink1URL=http://www.yageo.com/documents/recent/UPY-GP_NP0_16V-to-50V_16.pdf?src-supplier=Digi-Key, ComponentLink2Description=http://www.yageo.com/exep/pages/download/literatures/ProductSelectionGuide%202014_Final_2.pdf?src-supplier=Digi-Key, ComponentLink2URL=http://www.yageo.com/exep/pages/download/literatures/ProductSelectionGuide%202014_Final_2.pdf?src-supplier=Digi-Key, Item Type=Capacitor, Length=0.063inch, Manufacturer Part Number=CC0603JRNPO9BN103, Mount="Surface Mount", Packaging="Tape and Reel", Pricing 1="1=0.42340, 10=0.29770, 25=0.25590, 100=0.19550, 250=0.19360, 500=0.14320, 1000=0.12060, 3000=0.11930 (USD)", RoHS=Yes, RoHS Compliant=Yes, Stock 1=5425, Supplier 1="Arrow Electronics", Supplier Part Number 1=CC0603JRNPO9BN103, Thickness=0.035inch, Width=0.031inch
C2 C13: library part TAJE107M025RNJ, "CAP TANT 100UF 20% 25V 2917", Case Code (Imperial)=2917, Case Code (Metric)=7343, ESR (Equivalent Series Resistance)=300mR, LCSC Part Number=C7230, Leakage Current=25uA, Manufacturer="Kyocera AVX", Max Operating Temperature=125°C, Min Operating Temperature=-55°C, Package Quantity=1, Supplier Part Number 1=581-TAJE107M025RNJ, Tolerance=20%, Voltage Rating=25V, Capacitance=100uF, Case/Package=2917, Category="Tantalum Capacitors", ComponentLink1Description=https://datasheet.ciiva.com/26787/taje107m025rnj-26787048.pdf?src-supplier=IIIC, ComponentLink1URL=https://datasheet.ciiva.com/26787/taje107m025rnj-26787048.pdf?src-supplier=IIIC, ComponentLink2Description=https://datasheet.ciiva.com/265/taj-265541.pdf?src-supplier=Digi-Key, ComponentLink2URL=https://datasheet.ciiva.com/265/taj-265541.pdf?src-supplier=Digi-Key, ComponentLink3Description=https://datasheet.ciiva.com/265/taj-265542.pdf?src-supplier=Digi-Key, ComponentLink3URL=https://datasheet.ciiva.com/265/taj-265542.pdf?src-supplier=Digi-Key, ComponentLink4Description=https://datasheet.ciiva.com/265/taj-265540.pdf?src-supplier=Digi-Key, ComponentLink4URL=https://datasheet.ciiva.com/265/taj-265540.pdf?src-supplier=Digi-Key, ComponentLink5Description=https://datasheet.ciiva.com/28609/1719052-28609254.pdf?src-supplier=Element14, ComponentLink5URL=https://datasheet.ciiva.com/28609/1719052-28609254.pdf?src-supplier=Element14, ComponentLink6Description=https://datasheet.ciiva.com/11230/taj-11230456.pdf?src-supplier=Avnet, ComponentLink6URL=https://datasheet.ciiva.com/11230/taj-11230456.pdf?src-supplier=Avnet, ComponentLink7Description=https://datasheet.ciiva.com/17339/taj-17339677.pdf?src-supplier=Avnet+Europe, ComponentLink7URL=https://datasheet.ciiva.com/17339/taj-17339677.pdf?src-supplier=Avnet+Europe, ComponentLink8Description=https://datasheet.ciiva.com/22667/1719052-22667581.pdf?src-supplier=Element14, ComponentLink8URL=https://datasheet.ciiva.com/22667/1719052-22667581.pdf?src-supplier=Element14, Construction=Flat, Depth=4.3mm, Dissipation Factor=10%, Features="General Purpose", Height=4.3mm, Height - Seated (Max)=0.169inch, Lead Free="Lead Free", Length=7.3mm, Manufacturer Part Number=TAJE107M025RNJ, Mount="Surface Mount", Number of Pins=2, Packaging="Tape and Reel", Polarity=Polar, Pricing 1="1=2.81000, 10=2.81000, 50=2.81000, 100=2.19000, 1000=1.76000, 10000=1.76000 (USD)", Radiation Hardening=No, REACH SVHC="No SVHC", RoHS=Yes, RoHS Compliant=Yes, Series=TAJ, Stock 1=109, Supplier 1=Mouser, Termination=SMD/SMT, Voltage Rating (DC)=25V, Width=4.3mm
C3 C4 C6 C7 C8 C10 C12 C16 C32 C33 C34 C35 C53 C57: library part CC0603KRX5R8BB105, "CAP CER 1UF 25V X5R 0603", Case Code (Imperial)=0603, Case Code (Metric)=1608, Dielectric=X5R, LCSC Part Number=C14664, Manufacturer=Yageo, Max Operating Temperature=85°C, Min Operating Temperature=-55°C, Package Quantity=1, Supplier Part Number 1=311-1445-1-ND, Tolerance=10%, Voltage Rating=25V, Capacitance=1uF, Case/Package=0603, Category="Ceramic Capacitors", ComponentLink1Description=https://datasheet.ciiva.com/176/mlccorderingcode-176785.pdf?src-supplier=Digi-Key, ComponentLink1URL=https://datasheet.ciiva.com/176/mlccorderingcode-176785.pdf?src-supplier=Digi-Key, ComponentLink2Description=https://datasheet.ciiva.com/176/mlccorderingcode-176786.pdf?src-supplier=Digi-Key, ComponentLink2URL=https://datasheet.ciiva.com/176/mlccorderingcode-176786.pdf?src-supplier=Digi-Key, ComponentLink3Description=https://datasheet.ciiva.com/176/mlccorderingcode-176787.pdf?src-supplier=Digi-Key, ComponentLink3URL=https://datasheet.ciiva.com/176/mlccorderingcode-176787.pdf?src-supplier=Digi-Key, ComponentLink4Description=https://datasheet.ciiva.com/17436/upy-gphc-x5r-4v-to-50v-12-17436952.pdf?src-supplier=Avnet+Europe, ComponentLink4URL=https://datasheet.ciiva.com/17436/upy-gphc-x5r-4v-to-50v-12-17436952.pdf?src-supplier=Avnet+Europe, ComponentLink5Description=https://datasheet.ciiva.com/7978/1525783-7978171.pdf?src-supplier=Element14, ComponentLink5URL=https://datasheet.ciiva.com/7978/1525783-7978171.pdf?src-supplier=Element14, ComponentLink6Description=https://datasheet.ciiva.com/11586/upy-gphc-x5r-4v-to-50v-12-11586318.pdf?src-supplier=Avnet, ComponentLink6URL=https://datasheet.ciiva.com/11586/upy-gphc-x5r-4v-to-50v-12-11586318.pdf?src-supplier=Avnet, Construction=Flat, Depth=0.8mm, Halogen Free="Halogen Free", Height=0.8mm, Lead Free="Lead Free", Length=1.6mm, Manufacturer Part Number=CC0603KRX5R8BB105, Mount="Surface Mount", Number of Pins=2, Packaging="Tape and Reel", Pricing 1="1=0.12000, 10=0.08400, 50=0.04760, 100=0.03940, 500=0.02764, 1000=0.02288 (USD)", Radiation Hardening=No, REACH SVHC="No SVHC", RoHS=Yes, RoHS Compliant=Yes, Series=CC, Stock 1=919939, Supplier 1=Digi-Key, Termination=SMD/SMT, Thickness=0.035inch, Voltage Rating (DC)=25V, Width=0.031inch
  C3 C4 C6 C7 C8 C10 C12 C32 C33 C34 C35 C53 C57: Item Type=Capacitor
C5: library part CC0603KRX7R9BB223, "CAP CER 0.022UF 50V X7R 0603", Case Code (Imperial)=0603, Case Code (Metric)=1608, Dielectric=X7R, Dielectric Material=Ceramic, Insulation Resistance=100GR, LCSC Part Number=C106222, Manufacturer=Yageo, Max Operating Temperature=125°C, Min Operating Temperature=-55°C, Package Quantity=1, Supplier Part Number 1=311-1370-1-ND, Tolerance=10%, Voltage=50V, Capacitance=22nF, Case/Package=0603, Category="Ceramic Capacitors", ComponentLink1Description=https://datasheet.ciiva.com/8033/70765-8033869.pdf?src-supplier=Element14, ComponentLink1URL=https://datasheet.ciiva.com/8033/70765-8033869.pdf?src-supplier=Element14, ComponentLink2Description=https://datasheet.ciiva.com/28450/1489800-28450639.pdf?src-supplier=Element14, ComponentLink2URL=https://datasheet.ciiva.com/28450/1489800-28450639.pdf?src-supplier=Element14, ComponentLink3Description=https://datasheet.ciiva.com/8033/1489800-8033867.pdf?src-supplier=Element14, ComponentLink3URL=https://datasheet.ciiva.com/8033/1489800-8033867.pdf?src-supplier=Element14, ComponentLink4Description=https://datasheet.ciiva.com/8033/1489800-8033865.pdf?src-supplier=Element14, ComponentLink4URL=https://datasheet.ciiva.com/8033/1489800-8033865.pdf?src-supplier=Element14, ComponentLink5Description=https://datasheet.ciiva.com/156/mlccorderingcode-156178.pdf?src-supplier=Digi-Key, ComponentLink5URL=https://datasheet.ciiva.com/156/mlccorderingcode-156178.pdf?src-supplier=Digi-Key, ComponentLink6Description=https://datasheet.ciiva.com/156/mlccorderingcode-156177.pdf?src-supplier=Digi-Key, ComponentLink6URL=https://datasheet.ciiva.com/156/mlccorderingcode-156177.pdf?src-supplier=Digi-Key, ComponentLink7Description=https://datasheet.ciiva.com/156/mlccorderingcode-156179.pdf?src-supplier=Digi-Key, ComponentLink7URL=https://datasheet.ciiva.com/156/mlccorderingcode-156179.pdf?src-supplier=Digi-Key, ComponentLink8Description=https://datasheet.ciiva.com/11464/upy-gphc-x7r-6-3v-to-50v-8-11464741.pdf?src-supplier=Avnet, ComponentLink8URL=https://datasheet.ciiva.com/11464/upy-gphc-x7r-6-3v-to-50v-8-11464741.pdf?src-supplier=Avnet, Depth=0.8mm, Halogen Free="Halogen Free", Height=0.8mm, Lead Free="Lead Free", Length=1.6mm, Manufacturer Part Number=CC0603KRX7R9BB223, Mount="Surface Mount", Number of Pins=2, Packaging="Tape and Reel", Pricing 1="1=0.10000, 10=0.05500, 50=0.03020, 100=0.02460, 500=0.01760, 1000=0.01383 (USD)", Radiation Hardening=No, REACH SVHC="No SVHC", Resistor Type=Ceramic, RoHS=Yes, RoHS Compliant=Yes, Series=CC, Stock 1=119735, Supplier 1=Digi-Key, Termination=SMD/SMT, Thickness=0.035inch, Voltage Rating=50V, Voltage Rating (DC)=50V, Width=0.031inch
C9 C11 C15 C17 C19 C20 C21 C22 C25 C26 C31 C37 C39 C40 C42 C45 C47 C49 C54 C59 C60 C61: library part CC0402KRX5R8BB104, "CAP CER 0.1UF 25V X5R 0402", Case Code (Imperial)=0402, Case Code (Metric)=1005, Dielectric=X5R, LCSC Part Number=C106256, Manufacturer=Yageo, Max Operating Temperature=85°C, Min Operating Temperature=-55°C, Resistor Type=Ceramic, Supplier Part Number 1=311-1697-1-ND, Tolerance=10%, Voltage Rating=25V, Capacitance=100nF, Case/Package=0402, Category="Ceramic Capacitors", ComponentLink1Description=http://www.mouser.com/ds/2/447/UPY-GPHC_X5R_4V-to-50V_25-1131599.pdf?src-supplier=Mouser, ComponentLink1URL=http://www.mouser.com/ds/2/447/UPY-GPHC_X5R_4V-to-50V_25-1131599.pdf?src-supplier=Mouser, ComponentLink2Description=http://www.yageo.com/documents/recent/UPY-GPHC_X5R_4V-to-50V-16.pdf?src-supplier=Future+Electronics, ComponentLink2URL=http://www.yageo.com/documents/recent/UPY-GPHC_X5R_4V-to-50V-16.pdf?src-supplier=Future+Electronics, ComponentLink3Description=http://www.yageo.com/documents/recent/UPY-GPHC_X5R_4V-to-50V_25.pdf?src-supplier=Digi-Key, ComponentLink3URL=http://www.yageo.com/documents/recent/UPY-GPHC_X5R_4V-to-50V_25.pdf?src-supplier=Digi-Key, Depth=0.5mm, Halogen Free="Halogen Free", Item Type=Capacitor, Lead Free="Lead Free", Length=0.039inch, Manufacturer Part Number=CC0402KRX5R8BB104, Mount="Surface Mount", Packaging="Tape and Reel", Pricing 1="1=0.10000, 10=0.03800, 50=0.02100, 100=0.01710, 500=0.01224, 1000=0.00961, 2500=0.00874, 5000=0.00804 (USD)", RoHS=Yes, RoHS Compliant=Yes, Series=CC, Stock 1=4598218, Supplier 1=Digi-Key, Thickness=0.022inch, Voltage Rating (DC)=25V, Width=0.02inch
C14 C52: library part CC0603KRX5R7BB106, "CAP CER 10UF 16V X5R 0603", Case Code (Imperial)=0603, Case Code (Metric)=1608, LCSC Part Number=C2936601, Manufacturer=Yageo, Max Operating Temperature=85°C, Min Operating Temperature=-55°C, Supplier Part Number 1=311-3486-1-ND, Tolerance=10%, Voltage Rating=16V, Capacitance=10uF, Case/Package=0603, Category="Ceramic Capacitors", ComponentLink1Description=http://www.yageo.com/documents/recent/UPY-GPHC_X5R_4V-to-50V_25.pdf?src-supplier=Digi-Key, ComponentLink1URL=http://www.yageo.com/documents/recent/UPY-GPHC_X5R_4V-to-50V_25.pdf?src-supplier=Digi-Key, Item Type=Capacitor, Manufacturer Part Number=CC0603KRX5R7BB106, Mount="Surface Mount", Packaging="Cut Tape", Pricing 1="1=0.68000, 10=0.48000, 50=0.36300, 100=0.31610, 500=0.23416, 1000=0.19903 (USD)", RoHS=Yes, RoHS Compliant=Yes, Stock 1=240725, Supplier 1=Digi-Key
C18 C23: library part C2012X5R1V226MT000E, "CAP CER 22UF 35V X5R 0805", LCSC Part Number=C338080, Manufacturer="TDK Corporation", Package=0805, ComponentLink1Description=LCSC, ComponentLink1URL=https://www.lcsc.com/product-detail/Multilayer-Ceramic-Capacitors-MLCC-SMD-SMT_TDK-C2012X5R1V226M125AC_C2179409.html, Manufacturer Part Number=C2012X5R1V226MT000E
C24 C30 C38 C44 C46 C48: library part CC0603KRX5R7BB475, "CAP CER 4.7UF 16V X5R 0603", Case Code (Imperial)=0603, Case Code (Metric)=1608, Dielectric=X5R, LCSC Part Number=C277476, Manufacturer=Yageo, Max Operating Temperature=85°C, Min Operating Temperature=-55°C, Resistor Type=Ceramic, Supplier Part Number 1=311-1785-1-ND, Tolerance=10%, Voltage Rating=16V, Capacitance=4.7uF, Case/Package=0603, Category="Ceramic Capacitors", ComponentLink1Description=http://www.mouser.com/ds/2/447/UPY-GPHC_X5R_4V-to-50V_25-1131599.pdf?src-supplier=Mouser, ComponentLink1URL=http://www.mouser.com/ds/2/447/UPY-GPHC_X5R_4V-to-50V_25-1131599.pdf?src-supplier=Mouser, ComponentLink2Description=http://www.yageo.com/documents/recent/UPY-GPHC_X5R_4V-to-50V_25.pdf?src-supplier=Digi-Key, ComponentLink2URL=http://www.yageo.com/documents/recent/UPY-GPHC_X5R_4V-to-50V_25.pdf?src-supplier=Digi-Key, Depth=0.8mm, Halogen Free="Halogen Free", Height=0.8mm, Lead Free="Lead Free", Length=1.6mm, Manufacturer Part Number=CC0603KRX5R7BB475, Mount="Surface Mount", Packaging="Tape and Reel", Pricing 1="1=0.20000, 10=0.13800, 50=0.08280, 100=0.06990, 500=0.04784, 1000=0.04233 (USD)", RoHS=Yes, RoHS Compliant=Yes, Series=CC, Stock 1=547703, Supplier 1=Digi-Key, Termination=SMD/SMT, Thickness=0.037inch, Voltage Rating (DC)=16V, Weight=7.1E-05oz, Width=0.8mm
C27 C28 C29: library part GRM1555C1E330JA01D, "CAP CER 33PF 25V C0G/NP0 0402", Case Code (Imperial)=0402, Case Code (Metric)=1005, Dielectric=C0G, LCSC Part Number=C441758, Manufacturer=Murata, Max Operating Temperature=125°C, Min Operating Temperature=-55°C, Package Quantity=1, Supplier Part Number 1=490-6177-1-ND, Tolerance=5%, Voltage=25V, Capacitance=33pF, Case/Package=0402, ComponentLink1Description=https://www.murata.com/~/media/webrenewal/support/library/catalog/products/capacitor/mlcc/c02e.ashx?la=en-us&src-supplier=Digi-Key, ComponentLink1URL=https://www.murata.com/~/media/webrenewal/support/library/catalog/products/capacitor/mlcc/c02e.ashx?la=en-us&src-supplier=Digi-Key, ComponentLink2Description=http://www.mouser.com/ds/2/281/c02e-2905.pdf?src-supplier=Mouser, ComponentLink2URL=http://www.mouser.com/ds/2/281/c02e-2905.pdf?src-supplier=Mouser, ComponentLink3Description=http://psearch.murata.com/capacitor/product/GRM1555C1E330JA01%23.pdf?src-supplier=Avnet, ComponentLink3URL=http://psearch.murata.com/capacitor/product/GRM1555C1E330JA01%23.pdf?src-supplier=Avnet, Construction=Flat, Depth=0.5mm, Height=0.5mm, Lead Free="Lead Free", Length=1mm, Manufacturer Part Number=GRM1555C1E330JA01D, Mount="Surface Mount", Packaging="Tape and Reel", Pricing 1="1=0.1, 10=0.034, 50=0.0184, 100=0.0151, 500=0.01078, 1000=0.00847, 2500=0.0077, 5000=0.00708 (USD)", Radiation Hardening=No, RoHS Compliant=Yes, Series=GRM, Stock 1=250773, Supplier 1=Digi-Key, Termination=SMD/SMT, Thickness=0.022inch, Voltage Rating=25V, Voltage Rating (DC)=25V, Width=0.02inch
C36: library part CC0603KRX5R6BB106, "CAP CER 10UF 10V X5R 0603", Case Code (Imperial)=0603, Case Code (Metric)=1608, Dielectric=X5R, LCSC Part Number=C326057, Manufacturer=Yageo, Max Operating Temperature=85°C, Min Operating Temperature=-55°C, Package Quantity=4000, Resistor Type=Ceramic, Supplier Part Number 1=311-1782-1-ND, Tolerance=10%, Voltage Rating=10V, Capacitance=10uF, Case/Package=0603, Category="Ceramic Capacitors", ComponentLink1Description=http://www.mouser.com/ds/2/447/Yageo_UPY-GP_NP0_16V-to-50V_9-358835.pdf?src-supplier=Mouser, ComponentLink1URL=http://www.mouser.com/ds/2/447/Yageo_UPY-GP_NP0_16V-to-50V_9-358835.pdf?src-supplier=Mouser, ComponentLink2Description=http://www.yageo.com/documents/recent/UPY-GPHC_X5R_4V-to-50V_25.pdf?src-supplier=Digi-Key, ComponentLink2URL=http://www.yageo.com/documents/recent/UPY-GPHC_X5R_4V-to-50V_25.pdf?src-supplier=Digi-Key, Depth=0.8mm, Halogen Free="Halogen Free", Lead Free="Lead Free", Length=0.063inch, Manufacturer Part Number=CC0603KRX5R6BB106, Mount="Surface Mount", Packaging="Tape and Reel", Pricing 1="1=0.24000, 10=0.16300, 50=0.09780, 100=0.08260, 500=0.05654, 1000=0.05001 (USD)", RoHS=Yes, RoHS Compliant=Yes, Stock 1=187515, Supplier 1=Digi-Key, Termination=SMD/SMT, Thickness=0.035inch, Voltage Rating (DC)=10V, Weight=7.1E-05oz, Width=0.031inch
C50 C51: library part CC0603JRNPO9BN331, "CAP CER 330PF 50V C0G/NPO 0603", Capacitor Type=Ceramic, Case/Package=0603, LCSC Part Number=C62784, Manufacturer=Yageo, Max Operating Temperature=125°C, Min Operating Temperature=-55°C, Package Shape=Rectangular, Package Style=SMTMeter, Rated DC Voltage (URdc)=50V, Supplier Part Number 1=8843708, Temperature Characteristics Code=C0G, Tolerance  (fill in as +-)=5%, Category="Ceramic Capacitors", ComponentLink1Description=https://datasheet.ciiva.com:443/pdfs/VipMasterIC/IC/YAGO/YAGO-S-A0009251638/YAGO-S-A0009251638-1.pdf?src-supplier=IHS+Markit, ComponentLink1URL=https://datasheet.ciiva.com:443/pdfs/VipMasterIC/IC/YAGO/YAGO-S-A0009251638/YAGO-S-A0009251638-1.pdf?src-supplier=IHS+Markit, ComponentLink2Description=https://datasheet.ciiva.com/28450/1443161-28450501.pdf?src-supplier=Element14, ComponentLink2URL=https://datasheet.ciiva.com/28450/1443161-28450501.pdf?src-supplier=Element14, ComponentLink3Description=https://datasheet.ciiva.com/144/mlccorderingcode-144957.pdf?src-supplier=Digi-Key, ComponentLink3URL=https://datasheet.ciiva.com/144/mlccorderingcode-144957.pdf?src-supplier=Digi-Key, ComponentLink4Description=https://datasheet.ciiva.com/144/mlccorderingcode-144956.pdf?src-supplier=Digi-Key, ComponentLink4URL=https://datasheet.ciiva.com/144/mlccorderingcode-144956.pdf?src-supplier=Digi-Key, ComponentLink5Description=https://datasheet.ciiva.com/144/mlccorderingcode-144958.pdf?src-supplier=Digi-Key, ComponentLink5URL=https://datasheet.ciiva.com/144/mlccorderingcode-144958.pdf?src-supplier=Digi-Key, ComponentLink6Description=https://datasheet.ciiva.com/8033/1443161-8033739.pdf?src-supplier=Element14, ComponentLink6URL=https://datasheet.ciiva.com/8033/1443161-8033739.pdf?src-supplier=Element14, ComponentLink7Description=https://datasheet.ciiva.com/8033/1443161-8033737.pdf?src-supplier=Element14, ComponentLink7URL=https://datasheet.ciiva.com/8033/1443161-8033737.pdf?src-supplier=Element14, ComponentLink8Description=https://datasheet.ciiva.com/13389/upy-gp-np0-16v-to-50v-8-13389983.pdf?src-supplier=Mouser, ComponentLink8URL=https://datasheet.ciiva.com/13389/upy-gp-np0-16v-to-50v-8-13389983.pdf?src-supplier=Mouser, ComponentLink9Description=https://datasheet.ciiva.com/11587/upy-gp-np0-16v-to-50v-8-11587326.pdf?src-supplier=Avnet, ComponentLink9URL=https://datasheet.ciiva.com/11587/upy-gp-np0-16v-to-50v-8-11587326.pdf?src-supplier=Avnet, ComponentLink10Description=https://datasheet.ciiva.com/26829/getdatasheetpartid-403533-26829382.pdf?src-supplier=Verical, ComponentLink10URL=https://datasheet.ciiva.com/26829/getdatasheetpartid-403533-26829382.pdf?src-supplier=Verical, Dielectric Material=Ceramic, Height=0.8mm, Item Type=Capacitor, JESD-609 Code=e3, Length=1.6mm, Manufacturer Part Number=CC0603JRNPO9BN331, Mounting Technology="Surface Mount", Multilayer=Yes, Packaging="Tape and Reel", Pins=2, Pricing 1="4000=0.00990, 16000=0.00940, 20000=0.00980, 40000=0.00910, 80000=0.00930, 100000=0.00880, 160000=0.00830, 200000=0.00900, 500000=0.00850 (USD)", Reach SVHC Compliant=Yes, RoHS=Yes, RoHS Compliant=Yes, Stock 1=40000, Supplier 1="Future Electronics", Terminal Finish=Nickel, Termination=Wraparound, Tolerance (fill in as +-)=5%, Width=0.8mm
C55 C56: library part CC0603JRX7R9BB153, "CAP CER 0.015UF 50V X7R 0603", Case Code (Imperial)=0603, Case Code (Metric)=1608, Dielectric=X7R, LCSC Part Number=C519550, Manufacturer=Yageo, Max Operating Temperature=125°C, Min Operating Temperature=-55°C, Resistor Type=Ceramic, Supplier Part Number 1=8958167, Tolerance=5%, Voltage Rating=50V, Case/Package=0603, Category="Ceramic Capacitors", ComponentLink1Description=http://www.mouser.com/ds/2/447/Yageo_UPY-GP_NP0_16V-to-50V_9-358835.pdf?src-supplier=Mouser, ComponentLink1URL=http://www.mouser.com/ds/2/447/Yageo_UPY-GP_NP0_16V-to-50V_9-358835.pdf?src-supplier=Mouser, ComponentLink2Description=https://www.yageo.com/upload/media/product/productsearch/datasheet/mlcc/UPY-GPHC_X7R_6.3V-to-50V_18.pdf?src-supplier=Digi-Key, ComponentLink2URL=https://www.yageo.com/upload/media/product/productsearch/datasheet/mlcc/UPY-GPHC_X7R_6.3V-to-50V_18.pdf?src-supplier=Digi-Key, ComponentLink3Description=http://www.yageo.com/documents/recent/UPY-GPHC_X7R_6.3V-to-50V_8.pdf?src-supplier=Avnet, ComponentLink3URL=http://www.yageo.com/documents/recent/UPY-GPHC_X7R_6.3V-to-50V_8.pdf?src-supplier=Avnet, ComponentLink4Description=http://www.yageo.com/documents/recent/UPY-GPHC_X7R_6.3V-to-50V_9.pdf?src-supplier=Future+Electronics, ComponentLink4URL=http://www.yageo.com/documents/recent/UPY-GPHC_X7R_6.3V-to-50V_9.pdf?src-supplier=Future+Electronics, ComponentLink5Description=http://www.yageo.com/documents/recent/UPY-GPHC_X7R_6.3V-to-50V_16.pdf?src-supplier=Digi-Key, ComponentLink5URL=http://www.yageo.com/documents/recent/UPY-GPHC_X7R_6.3V-to-50V_16.pdf?src-supplier=Digi-Key, Construction=Flat, Depth=0.8mm, Halogen Free="Halogen Free", Height=0.8mm, Item Type=Capacitor, Lead Free="Lead Free", Length=1.6mm, Manufacturer Part Number=CC0603JRX7R9BB153, Mounting Technology="Surface Mount", Packaging="Tape and Reel", Pricing 1="4000=0.00980, 16000=0.00930, 60000=0.00890, 100000=0.00870, 200000=0.00820 (USD)", Radiation Hardening=No, RoHS=Yes, RoHS Compliant=Yes, Series=CC, Stock 1=16000, Supplier 1="Future Electronics", Termination=SMD/SMT, Thickness=0.035inch, Voltage Rating (DC)=50V, Weight=7.1E-05oz, Width=0.031inch
C58: library part CC0603KRX7R9BB822, "CAP CER 8.2nF 50V X7R 10% 0603", Case Code (Imperial)=0603, Case Code (Metric)=1608, Dielectric=X7R, Dielectric Material=Ceramic, Insulation Resistance=100GR, LCSC Part Number=C113812, Manufacturer=Yageo, Max Operating Temperature=125°C, Min Operating Temperature=-55°C, Supplier Part Number 1=311-1811-1-ND, Tolerance=10%, Voltage Rating=50V, Capacitance=8.2nF, Case/Package=0603, Category="Ceramic Capacitors", ComponentLink1Description=https://datasheet.ciiva.com/11465/upy-gphc-x7r-6-3v-to-50v-8-11465276.pdf?src-supplier=Avnet, ComponentLink1URL=https://datasheet.ciiva.com/11465/upy-gphc-x7r-6-3v-to-50v-8-11465276.pdf?src-supplier=Avnet, ComponentLink2Description=https://datasheet.ciiva.com/17434/upy-gphc-x7r-6-3v-to-50v-8-17434493.pdf?src-supplier=Avnet+Europe, ComponentLink2URL=https://datasheet.ciiva.com/17434/upy-gphc-x7r-6-3v-to-50v-8-17434493.pdf?src-supplier=Avnet+Europe, ComponentLink3Description=https://datasheet.ciiva.com/8033/1489800-8033887.pdf?src-supplier=Element14, ComponentLink3URL=https://datasheet.ciiva.com/8033/1489800-8033887.pdf?src-supplier=Element14, ComponentLink4Description=https://datasheet.ciiva.com/13208/upy-gphc-x7r-6-3v-to-50v-8-12304-13208847.pdf?src-supplier=Mouser, ComponentLink4URL=https://datasheet.ciiva.com/13208/upy-gphc-x7r-6-3v-to-50v-8-12304-13208847.pdf?src-supplier=Mouser, Construction=Flat, Depth=0.8mm, Halogen Free="Halogen Free", Height=0.8mm, Lead Free="Lead Free", Length=1.6mm, Manufacturer Part Number=CC0603KRX7R9BB822, Mount="Surface Mount", Packaging="Tape and Reel", Pricing 1="1=0.10000, 10=0.07300, 50=0.03980, 100=0.03250, 500=0.02318, 1000=0.01822 (USD)", Radiation Hardening=No, REACH SVHC=Unknown, Resistor Type=Ceramic, RoHS=Yes, RoHS Compliant=Yes, Series=CC, Stock 1=31159, Supplier 1=Digi-Key, Termination=SMD/SMT, Thickness=0.035inch, Voltage Rating (DC)=50V, Weight=7.1E-05oz, Width=0.031inch
D2: "16A 20V 7V 5V@Max Unidirectional SOT-23 TVS ROHS", LCSC Part Number=C239643, Manufacturer=WILLSEMI, Package=SOT-23, ComponentLink1Description=LCSC, ComponentLink1URL=https://www.lcsc.com/product-detail/TVS_WILLSEMI-Will-Semicon-ESD5302F-3-TR_C239643.html, Item Type=Diode, Manufacturer Part Number=ESD5302F-3/TR
D3: "40V 550mV@2A 2A SOD-123FL Schottky Barrier Diodes (SBD) ROHS", LCSC Part Number=C64890, Manufacturer=MDD, Package=SOD-123FL, ComponentLink1Description=LCSC, ComponentLink1URL=https://www.lcsc.com/product-detail/Schottky-Barrier-Diodes-SBD_MDD-Microdiode-Electronics-DSK24-K24_C64890.html, Item Type=Diode, Manufacturer Part Number="DSK24 K24"
D4: "20V 500mV@3A 3A SMA(DO-214AC) Schottky Barrier Diodes (SBD) ROHS", LCSC Part Number=C34897, Manufacturer=MDD, Manufacturer Part Number=SS32, Package=SMA(DO-214AC), ComponentLink1Description=LCSC, ComponentLink1URL=https://www.lcsc.com/product-detail/Schottky-Barrier-Diodes-SBD_MDD-Microdiode-Electronics-SS32_C34897.html, Item Type=Diode
FB1 FB2: "FERRITE BEAD 120 OHM 0603 1LN", Case Code (Imperial)=0603, Case Code (Metric)=1608, Current Rating=3A, DC Resistance (DCR)=25mR, Frequency=100MHz, LCSC Part Number=C113030, Manufacturer=Murata, Max Operating Temperature=125°C, Min Operating Temperature=-55°C, Package Quantity=1, Tolerance=25%, Case/Package=0603, Category="Ferrite Beads and Chips", ComponentLink1Description=https://datasheet.ciiva.com/1012/l0110s0100blm18s-1012624.pdf?src-supplier=Digi-Key, ComponentLink1URL=https://datasheet.ciiva.com/1012/l0110s0100blm18s-1012624.pdf?src-supplier=Digi-Key, ComponentLink2Description=https://datasheet.ciiva.com/11799/0900766b811b5866-11799181.pdf?src-supplier=RSComponents, ComponentLink2URL=https://datasheet.ciiva.com/11799/0900766b811b5866-11799181.pdf?src-supplier=RSComponents, ComponentLink3Description=https://datasheet.ciiva.com/18093/getdatasheetpartid-295885-18093249.pdf?src-supplier=Verical, ComponentLink3URL=https://datasheet.ciiva.com/18093/getdatasheetpartid-295885-18093249.pdf?src-supplier=Verical, ComponentLink4Description=https://datasheet.ciiva.com/41449/001171723-da-01-en-chip-drossel0603-120r-3000ma-1-6x0-8mm-41449353.pdf?src-supplier=Conrad, ComponentLink4URL=https://datasheet.ciiva.com/41449/001171723-da-01-en-chip-drossel0603-120r-3000ma-1-6x0-8mm-41449353.pdf?src-supplier=Conrad, ComponentLink5Description=https://datasheet.ciiva.com/41449/001172312-da-01-en-drossel-0603-120r-1-6x0-8mm-10000st-41449675.pdf?src-supplier=Conrad, ComponentLink5URL=https://datasheet.ciiva.com/41449/001172312-da-01-en-drossel-0603-120r-1-6x0-8mm-10000st-41449675.pdf?src-supplier=Conrad, ComponentLink6Description=https://datasheet.ciiva.com/8021/5151-8021511.pdf?src-supplier=Element14, ComponentLink6URL=https://datasheet.ciiva.com/8021/5151-8021511.pdf?src-supplier=Element14, ComponentLink7Description=https://datasheet.ciiva.com/8021/5151-8021512.pdf?src-supplier=Element14, ComponentLink7URL=https://datasheet.ciiva.com/8021/5151-8021512.pdf?src-supplier=Element14, ComponentLink8Description=https://datasheet.ciiva.com/14122/blm-series-eng-tds-14122906.pdf?src-supplier=Distrelec, ComponentLink8URL=https://datasheet.ciiva.com/14122/blm-series-eng-tds-14122906.pdf?src-supplier=Distrelec, ComponentLink9Description=https://datasheet.ciiva.com/1012/l0110s0100blm18s-1012623.pdf?src-supplier=Digi-Key, ComponentLink9URL=https://datasheet.ciiva.com/1012/l0110s0100blm18s-1012623.pdf?src-supplier=Digi-Key, ComponentLink10Description=https://datasheet.ciiva.com/1012/l0110s0100blm18s-1012625.pdf?src-supplier=Digi-Key, ComponentLink10URL=https://datasheet.ciiva.com/1012/l0110s0100blm18s-1012625.pdf?src-supplier=Digi-Key, ComponentLink11Description=https://datasheet.ciiva.com/16395/l0110s0100blm18s-16395498.pdf?src-supplier=Future+Electronics, ComponentLink11URL=https://datasheet.ciiva.com/16395/l0110s0100blm18s-16395498.pdf?src-supplier=Future+Electronics, Core Material=Ferrite, DC Resistance-Max=25mR, Depth=0.8mm, Height=0.8mm, Impedance=120R, Item Type="Ferrite Bead", Lead Free="Lead Free", Length=1.6mm, Manufacturer Part Number=BLM18SG121TN1D, Material=Steel,Ferrite, Max Current Rating=3A, Max DC Current=3A, Number of Circuits=1, Number of Lines=1, Number of Pins=2, Packaging="Tape and Reel", Pricing 1="1=0.12640, 10=0.08350, 25=0.07210, 100=0.05150, 250=0.04730, 500=0.04110, 1000=0.03420, 3000=0.03360, 6000=0.03320, 15000=0.03270, 30000=0.03200, 75000=0.03150 (USD)", Reach SVHC Compliant=Yes, RoHS=Yes, RoHS Compliant=Yes, Series=BLM18S, Shielding=Unshielded, Stock 1=82612, Supplier 1="Arrow Electronics", Supplier Part Number 1=BLM18SG121TN1D, Termination=SMD/SMT, Test Frequency=100MHz, Width=0.8mm